# Altium PCB DockConnector.PcbDoc
Units mm, origin at the board's own origin, x right, y up, seen from the top; angles counter-clockwise.
Board outline 25 x 12 mm, 2 copper layers (Top, Bottom); 3 components, 2 nets, 4 pads, 0 vias.
Unrouted connection lines stored in the file: 2.
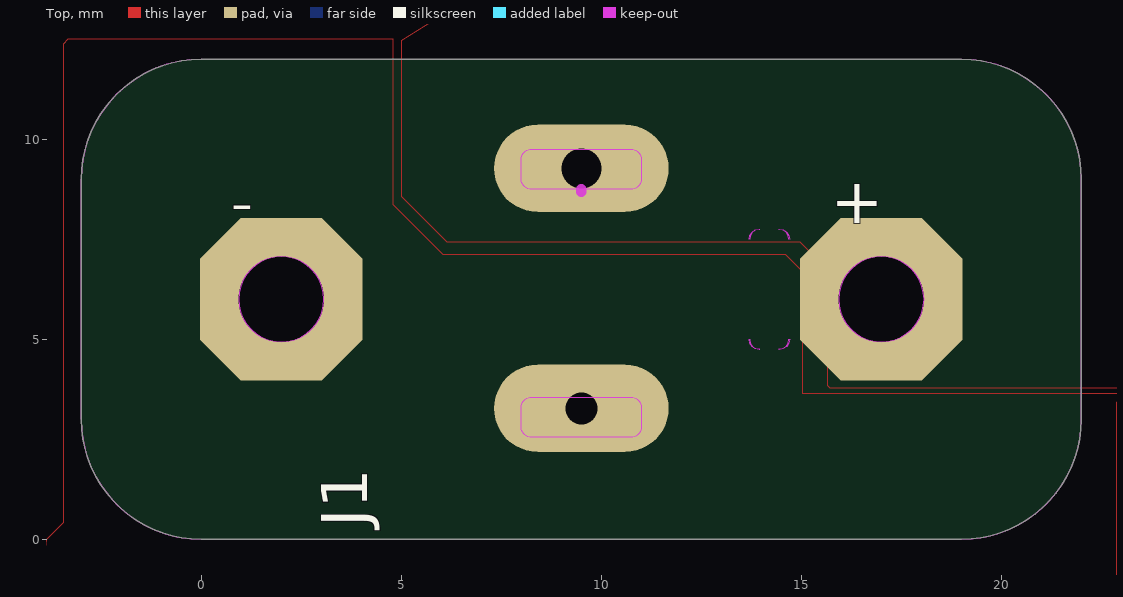
[diagram p0: Top view]
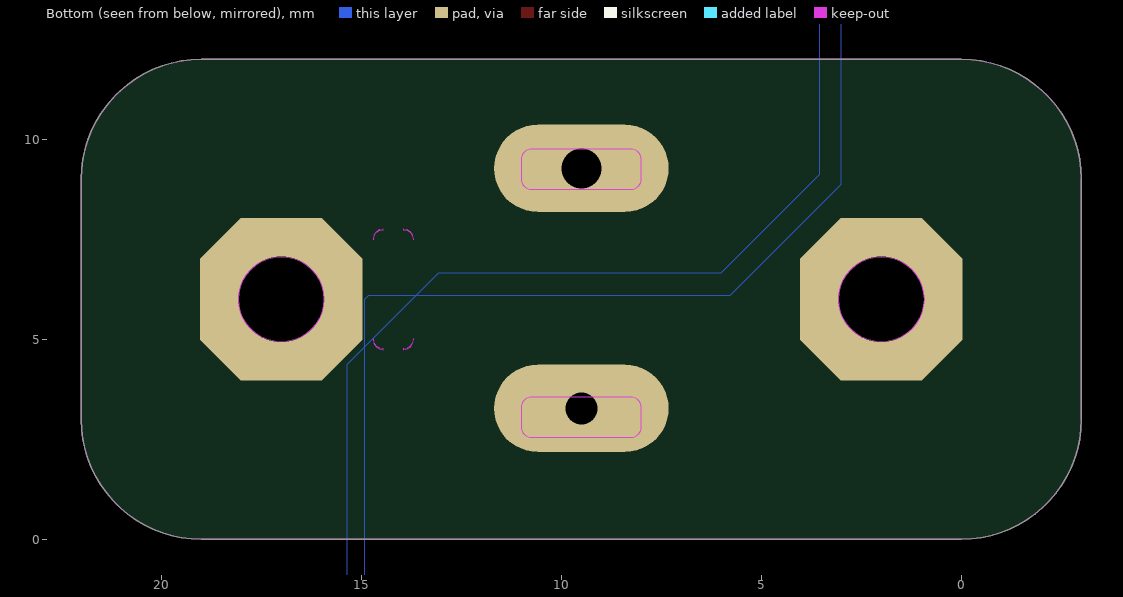
[diagram p1: Bottom view, seen from below]

## Layer stack, top to bottom
Top Solder: solder mask 0.0102, Solder Resist, Dk 3.5
Top: signal copper 0.035
Dielectric 1: dielectric 0.32, FR-4, Dk 4.8
Bottom: signal copper 0.035
Bottom Solder: solder mask 0.0102, Solder Resist, Dk 3.5

## Board outline
0,0 19,0 ccw(c19,3) 22,3 22,9 ccw(c19,9) 19,12 0,12 ccw(c0,9) -3,9 -3,3 ccw(c0,3)
cut-out: 2,4.933 ccw(c2,6) 3.067,6 ccw(c2,6) 2,7.067 ccw(c2,6) 0.933,6 ccw(c2,6)
cut-out: 17,4.933 ccw(c17,6) 18.067,6 ccw(c17,6) 17,7.067 ccw(c17,6) 15.933,6 ccw(c17,6)
cut-out: 8,9 8,9.5 cw(c8.25,9.5) 8.25,9.75 10.75,9.75 cw(c10.75,9.5) 11,9.5 11,9 cw(c10.75,9) 10.75,8.75 8.25,8.75 cw(c8.25,9)
cut-out: 10.75,2.55 8.25,2.55 cw(c8.25,2.8) 8,2.8 8,3.3 cw(c8.25,3.3) 8.25,3.55 10.75,3.55 cw(c10.75,3.3) 11,3.3 11,2.8 cw(c10.75,2.8)
cut-out: 13.726,4.908 13.779,4.829 13.857,4.777 13.95,4.758 13.95,4.75 13.95,4.745 13.852,4.765 13.77,4.82 13.715,4.903 13.695,5 13.7,5 13.708,5
cut-out: 14.685,4.902 14.63,4.82 14.548,4.765 14.45,4.745 14.45,4.75 14.45,4.758 14.543,4.777 14.621,4.829 14.674,4.907 14.692,5 14.705,5
cut-out: 14.548,7.736 14.63,7.68 14.685,7.598 14.705,7.5 14.692,7.5 14.674,7.593 14.621,7.671 14.543,7.724 14.45,7.742 14.45,7.75 14.45,7.755
cut-out: 13.95,7.755 13.95,7.75 13.95,7.742 13.857,7.724 13.779,7.671 13.726,7.593 13.708,7.5 13.7,7.5 13.695,7.5 13.715,7.598 13.77,7.68 13.852,7.736 13.95,7.755

## Design rules (kind name [scope] priority, off if disabled: settings)
BoardOutlineClearance mdCopperDimension [All] p1: gap=0.254 ignorepadtopadclearanceinfootprint=FALSE except(0: Arc-SplitContinuation Track-SplitContinuation SMDPad-SplitContinuation THPad-SplitContinuation Via-SplitContinuation Fill-SplitContinuation Poly-SplitContinuation Region-SplitContinuation Text-SplitContinuation; 0.2: Poly-OutlineEdge Poly-CavityEdge Poly-CutoutEdge Poly-SplitBarrior)
Clearance "Clearance (Same Net)" [All] p1: gap=0.127 ignorepadtopadclearanceinfootprint=FALSE
Clearance [All] p2: gap=0.127 ignorepadtopadclearanceinfootprint=FALSE
HoleSize [All] p1: absolutevalues=TRUE maxlimit=2540 minlimit=0.3 maxpercent=80.000 minpercent=20.000
HoleToHoleClearance mdDrill [All] p1: gap=0.152 allowstackedmicrovias=TRUE
MinimumSolderMaskSliver [All] p1 off: minsoldermaskwidth=0.254
PasteMaskExpansion mlMinCreamFrame [All] p1: expansion=0
PolygonConnect PolygonConnect_For_PolygonThermal_ON_Width60000_Gap100000 [InPolygonClass('PolygonThermal_ON_Width60000_Gap100000') vs Not IsVia] p1: connectstyle=Relief reliefconductorwidth=0.152 reliefentries=4 polygonreliefangle="90 Angle" airgapwidth=0.254
PolygonConnect ThermalVias [IsVia] p2: connectstyle=Direct reliefconductorwidth=0.254 reliefentries=4 polygonreliefangle="90 Angle" airgapwidth=0.254
PolygonConnect [All] p3: connectstyle=Relief reliefconductorwidth=0.254 reliefentries=4 polygonreliefangle="90 Angle" airgapwidth=0.254
RoutingVias [All] p1: holewidth=0.3 width=0.452 viastyle="Through Hole" minholewidth=0.3 minwidth=0.452 maxholewidth=2.54 maxwidth=2.54
SolderMaskExpansion mlMinStopFrame [All] p1: expansion=0.102 istentingtop=FALSE
Width [All] p1: maxlimit=0.254 minlimit=0.127 preferedwidth=0.127
26 further rules are at their usual default settings.

## Classes and differential pairs
polygon class PolygonThermal_ON_Width60000_Gap100000: Polygon_1_Net_N$2 Polygon_1_Net_N$3 Polygon_2_Net_N$2 Polygon_2_Net_N$3

## Components (designator, comment, footprint, x,y, rotation, side; value= is the part's Value field where it differs from the comment)
+ "" WIREPAD_2,54/1,1 17,6 r0 top
- "" WIREPAD_2,54/1,1 2,6 r0 top
J1 "" CON-JACK_SPC4077 9.5,6.276 r90 top

## Footprints (in the part's own frame and the unit in brackets; to place one, negate y for a bottom-side part, rotate by r counter-clockwise, add the part's x,y. Pads: shape width x height; smd on the part's side, far side on the other; paste and mask are expansions set on the pad)
CON-JACK_SPC4077 [mil] "CON-JACK_SPC4077"
  oval 86x172 hole 31.5: 1(-118.11,0)
  oval 86x172 hole 39.37: 3(118.11,0)
WIREPAD_2,54/1,1 [mil] "WIREPAD_2,54/1,1"
  oct 160x160 / inner round 147.82 / far side oct 160x160 hole 84: 1(0,0)

## Part data
+ -: library part WIREPAD_2,54/1,1, PackageName=WIREPAD_2,54/1,1
J1: library part CON-JACK_SPC4077, PackageName=CON-JACK_SPC4077

## Nets (pads, with @x,y where several pads share a name; then routed paths per layer and width w, separated by ;. In a path a pad name is that pad's centre, name@x,y a point inside that pad or via, vN(x,y) a via of type N, cw(c..) or ccw(c..) an arc to the next point about the centre after c; other vN are vias at no path point)
N$2: +.1 J1.3
N$3: -.1 J1.1

## Polygon pours and split planes (outlines as drawn)
N$3 on Top "Polygon_1_Net_N$3" (solid, remove dead copper, shelved, pour order 2): -4.093,-1.524 -2.012,-3.605 22.886,-3.605 22.886,3.425 23.095,3.634 15.043,3.634 15.037,3.64 15.037,6.688 14.736,6.99 14.612,7.114 6.052,7.114 4.801,8.365 4.801,12.499 -3.333,12.499 -3.454,12.378 -3.454,0.414 -3.881,-0.013
N$2 on Top "Polygon_1_Net_N$2" (solid, remove dead copper, shelved, pour order 0): 5.004,12.464 5.004,8.581 6.141,7.444 14.955,7.444 15.647,6.752 15.647,3.856 15.717,3.786 23.566,3.786 23.724,3.628 23.724,13.712 23.883,13.87 7.081,13.87 6.836,13.625
N$3 on Bottom "Polygon_2_Net_N$3" (solid, remove dead copper, shelved, pour order 1): -4.063,12.918 -4.063,-1.808 -3.206,-2.665 14.498,-2.665 14.91,-3.078 14.91,6.002 14.815,6.098 5.772,6.098 2.998,8.873 2.998,13.331 3.131,13.464 0.769,13.464 0.509,13.724
N$2 on Bottom "Polygon_2_Net_N$2" (solid, remove dead copper, shelved, pour order 3): 3.557,13.181 3.557,9.114 6.014,6.657 13.075,6.657 15.314,4.418 15.368,4.364 15.368,-1.014 27.147,-1.014 27.966,-1.833 27.966,13.14 27.105,14 25.813,15.293 7.806,15.293

## Keep-outs
Top:
  lines w0.254: 9.5,8.685 9.5,8.75
Keep-Out Layer:
  the board outline again, w0

## Silkscreen, mask and mechanical layers (free items; w line width, h text height)
Dimension:
  circle w0: c17,6 r1.067
  circle w0: c2,6 r1.067
  lines w0: -3,3 ccw(c0,3) 0,0 19,0 ccw(c19,3) 22,3 22,9 ccw(c19,9) 19,12 0,12 ccw(c0,9) -3,9 -3,3 ; 8,2.8 ccw(c8.25,2.8) 8.25,2.55 10.75,2.55 ccw(c10.75,2.8) 11,2.8 11,3.3 ccw(c10.75,3.3) 10.75,3.55 8.25,3.55 ccw(c8.25,3.3) 8,3.3 8,2.8 ; 8,9 ccw(c8.25,9) 8.25,8.75 10.75,8.75 ccw(c10.75,9) 11,9 11,9.5 ccw(c10.75,9.5) 10.75,9.75 8.25,9.75 ccw(c8.25,9.5) 8,9.5 8,9 ; 13.7,5 ccw(c13.95,5) 13.95,4.75 14.45,4.75 ccw(c14.45,5) 14.7,5 14.7,7.5 ccw(c14.45,7.5) 14.45,7.75 13.95,7.75 ccw(c13.95,7.5) 13.7,7.5 13.7,5
tPlace:
  text "_" at -2.26,6.631 h3.94
  text "+" at 18.974,4.828 h3.94